# Altium PCB MergenSMPSBoardDesign.PcbDoc (part 3 of 3)
Units mm, origin at the board's own origin, x right, y up, seen from the top; angles counter-clockwise.
Board outline 115 x 90 mm, 4 copper layers (Top Layer, Layer 2, Layer 3, Bottom Layer), stack 1.527 mm thick; 83 components, 46 nets, 675 pads, 1118 vias.
Unrouted connection lines stored in the file: 1.
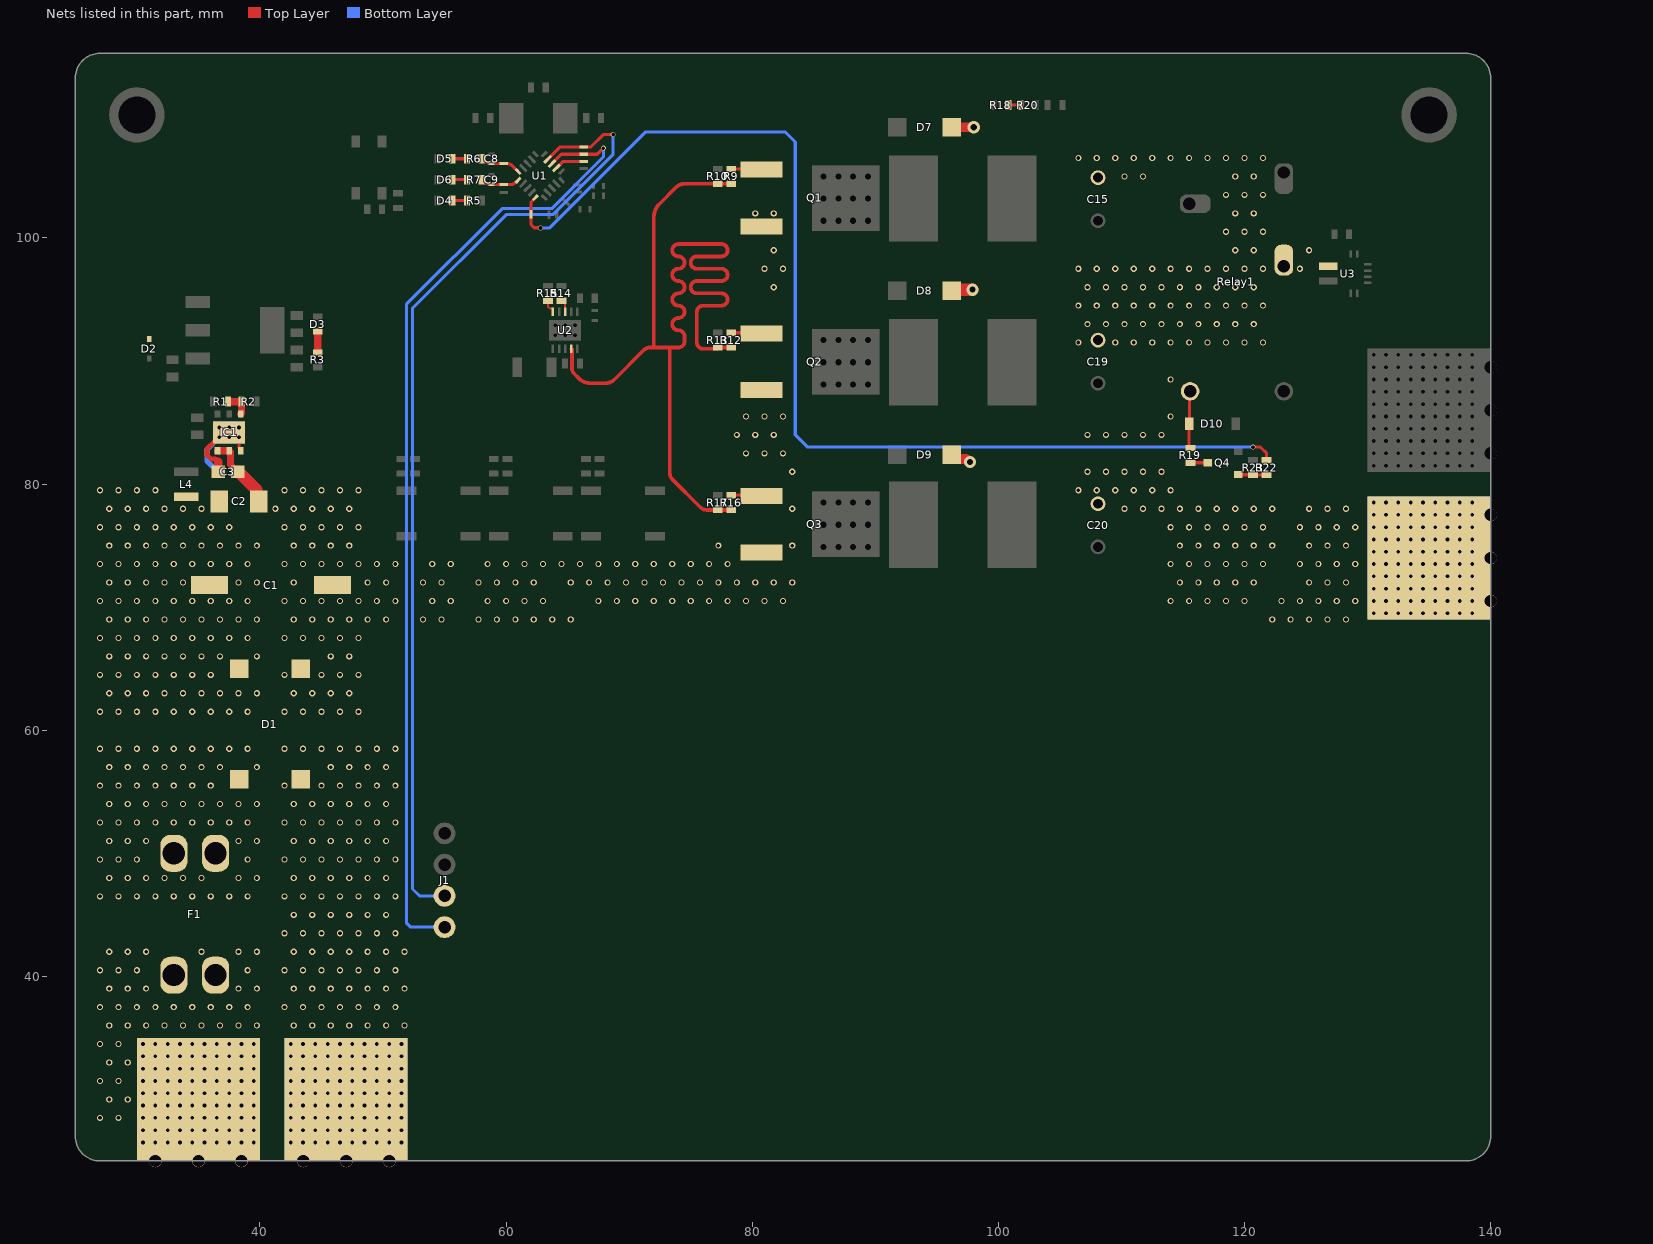
[diagram p5: the nets of this part, all layers, seen from the top]

## Via types
v1: diameter 0.5, hole 0.3, Top Layer to Bottom Layer, 829 vias
v2: diameter 0.5, hole 0.3, Top Layer to Bottom Layer, tented both sides, 255 vias
v3: diameter 0.406, hole 0.305, Top Layer to Bottom Layer, tented both sides, 25 vias
v4: diameter 3, hole 3, Top Layer to Bottom Layer, 4 vias
v5: diameter 1, hole 0.5, Top Layer to Bottom Layer, tented both sides, 3 vias
v6: diameter 0.406, hole 0.3, Top Layer to Bottom Layer, tented both sides, 2 vias

## Nets (pads, with @x,y where several pads share a name; then routed paths per layer and width w, separated by ;. In a path a pad name is that pad's centre, name@x,y a point inside that pad or via, vN(x,y) a via of type N, cw(c..) or ccw(c..) an arc to the next point about the centre after c; other vN are vias at no path point) (continued)
NetD1_3: D1.3 pad.10@47,30 pad.10@47.008,30.001 pad.12@42.5,26.5 pad.12@42.5,28.5 pad.12@42.5,30.5 pad.12@42.5,32.5 pad.12@42.5,34.5 pad.12@43.5,26.5 pad.12@43.5,28.5 pad.12@43.5,30.5 pad.12@43.5,32.5 pad.12@43.5,34.5 pad.12@44.5,26.5 pad.12@44.5,28.5 pad.12@44.5,30.5 pad.12@44.5,32.5 pad.12@44.5,34.5 pad.12@45.5,26.5 pad.12@45.5,28.5 pad.12@45.5,30.5 pad.12@45.5,32.5 pad.12@45.5,34.5 pad.12@46.5,26.5 pad.12@46.5,28.5 pad.12@46.5,30.5 pad.12@46.5,32.5 pad.12@46.5,34.5 pad.12@47.5,26.5 pad.12@47.5,28.5 pad.12@47.5,30.5 pad.12@47.5,32.5 pad.12@47.5,34.5 pad.12@48.5,26.5 pad.12@48.5,28.5 pad.12@48.5,30.5 pad.12@48.5,32.5 pad.12@48.5,34.5 pad.12@49.5,26.5 pad.12@49.5,28.5 pad.12@49.5,30.5 pad.12@49.5,32.5 pad.12@49.5,34.5 pad.12@50.5,26.5 pad.12@50.5,28.5 pad.12@50.5,30.5 pad.12@50.5,32.5 pad.12@50.5,34.5 pad.12@51.5,26.5 pad.12@51.5,28.5 pad.12@51.5,30.5 pad.12@51.5,32.5 pad.12@51.5,34.5 pad.13@42.5,27.5 pad.13@42.5,29.5 pad.13@42.5,31.5 pad.13@42.5,33.5 pad.13@43.5,27.5 pad.13@43.5,29.5 pad.13@43.5,31.5 pad.13@43.5,33.5 pad.13@44.5,27.5 pad.13@44.5,29.5 pad.13@44.5,31.5 pad.13@44.5,33.5 pad.13@45.5,27.5 pad.13@45.5,29.5 pad.13@45.5,31.5 pad.13@45.5,33.5 pad.13@46.5,27.5 pad.13@46.5,29.5 pad.13@46.5,31.5 pad.13@46.5,33.5 pad.13@47.5,27.5 pad.13@47.5,29.5 pad.13@47.5,31.5 pad.13@47.5,33.5 pad.13@48.5,27.5 pad.13@48.5,29.5 pad.13@48.5,31.5 pad.13@48.5,33.5 pad.13@49.5,27.5 pad.13@49.5,29.5 pad.13@49.5,31.5 pad.13@49.5,33.5 pad.13@50.5,27.5 pad.13@50.5,29.5 pad.13@50.5,31.5 pad.13@50.5,33.5 pad.13@51.5,27.5 pad.13@51.5,29.5 pad.13@51.5,31.5 pad.13@51.5,33.5 pad.14@43.508,25.001 pad.14@47.008,25.001 pad.14@50.508,25.001
  other v1: 42.75,36 44.25,36 45.75,36 47.25,36 48.75,36 50.25,36 51.75,36 42,37.5 43.5,37.5 45,37.5 46.5,37.5 48,37.5 49.5,37.5 51,37.5 42.75,39 44.25,39 45.75,39 47.25,39 48.75,39 50.25,39 51.75,39 42,40.5 43.5,40.5 45,40.5 46.5,40.5 48,40.5 49.5,40.5 51,40.5 42.75,42 44.25,42 45.75,42 47.25,42 48.75,42 50.25,42 51.75,42 42,43.5 43.5,43.5 45,43.5 46.5,43.5 48,43.5 49.5,43.5 51,43.5 42.75,45 44.25,45 45.75,45 47.25,45 48.75,45 50.25,45 42,46.5 43.5,46.5 45,46.5 46.5,46.5 48,46.5 49.5,46.5 51,46.5 42.75,48 44.25,48 45.75,48 47.25,48 48.75,48 50.25,48 42,49.5 43.5,49.5 45,49.5 46.5,49.5 48,49.5 49.5,49.5 51,49.5 42.75,51 44.25,51 45.75,51 47.25,51 48.75,51 50.25,51 42,52.5 43.5,52.5 45,52.5 46.5,52.5 48,52.5 49.5,52.5 51,52.5 42.75,54 44.25,54 45.75,54 47.25,54 48.75,54 50.25,54 42,55.5 45,55.5 46.5,55.5 48,55.5 49.5,55.5 51,55.5 45.75,57 47.25,57 48.75,57 50.25,57 42,58.5 43.5,58.5 45,58.5 46.5,58.5 48,58.5 49.5,58.5 51,58.5
NetD1_4: D1.4 F1.2
  other v1: 27,46.5 28.5,46.5 30,46.5 31.5,46.5 33,46.5 34.5,46.5 36,46.5 37.5,46.5 39,46.5 27.75,48 29.25,48 30.75,48 32.25,48 33.75,48 35.25,48 38.25,48 39.75,48 27,49.5 28.5,49.5 30,49.5 39,49.5 27.75,51 29.25,51 30.75,51 38.25,51 39.75,51 27,52.5 28.5,52.5 30,52.5 31.5,52.5 33,52.5 34.5,52.5 36,52.5 37.5,52.5 39,52.5 27.75,54 29.25,54 30.75,54 32.25,54 33.75,54 35.25,54 36.75,54 38.25,54 39.75,54 27,55.5 28.5,55.5 30,55.5 31.5,55.5 33,55.5 34.5,55.5 36,55.5 27.75,57 29.25,57 30.75,57 32.25,57 33.75,57 35.25,57 36.75,57 39.75,57 27,58.5 28.5,58.5 30,58.5 31.5,58.5 33,58.5 34.5,58.5 36,58.5 37.5,58.5 39,58.5
NetD3_1: D3.1 R3.2 | length 1.7
  Top Layer w0.6: R3.2@44.7,90.7 D3.1@44.7,92.4
NetD4_1: D4.1 R5.1 | length 1.2
  Top Layer w0.254: D4.1@55.618,103.036 R5.1@56.818,103.036
NetD5_2: D5.2 R6.1 | length 1.2
  Top Layer w0.254: D5.2@55.618,106.436 R6.1@56.818,106.436
NetD6_2: D6.2 R7.1 | length 1.2
  Top Layer w0.254: D6.2@55.618,104.736 R7.1@56.818,104.736
NetD10_1: D10.1 R19.2 Relay1.C1 | length 4.7
  Top Layer w0.254: Relay1.C1@115.58,87.541 115.54,87.501 115.54,84.94 D10.1@115.5,84.9 115.5,83.033 R19.2@115.6,82.933
NetF1_1: F1.1 pad.9@35,30 pad.12@30.5,26.5 pad.12@30.5,28.5 pad.12@30.5,30.5 pad.12@30.5,32.5 pad.12@30.5,34.5 pad.12@31.5,26.5 pad.12@31.5,28.5 pad.12@31.5,30.5 pad.12@31.5,32.5 pad.12@31.5,34.5 pad.12@32.5,26.5 pad.12@32.5,28.5 pad.12@32.5,30.5 pad.12@32.5,32.5 pad.12@32.5,34.5 pad.12@33.5,26.5 pad.12@33.5,28.5 pad.12@33.5,30.5 pad.12@33.5,32.5 pad.12@33.5,34.5 pad.12@34.5,26.5 pad.12@34.5,28.5 pad.12@34.5,30.5 pad.12@34.5,32.5 pad.12@34.5,34.5 pad.12@35.5,26.5 pad.12@35.5,28.5 pad.12@35.5,30.5 pad.12@35.5,32.5 pad.12@35.5,34.5 pad.12@36.5,26.5 pad.12@36.5,28.5 pad.12@36.5,30.5 pad.12@36.5,32.5 pad.12@36.5,34.5 pad.12@37.5,26.5 pad.12@37.5,28.5 pad.12@37.5,30.5 pad.12@37.5,32.5 pad.12@37.5,34.5 pad.12@38.5,26.5 pad.12@38.5,28.5 pad.12@38.5,30.5 pad.12@38.5,32.5 pad.12@38.5,34.5 pad.12@39.5,26.5 pad.12@39.5,28.5 pad.12@39.5,30.5 pad.12@39.5,32.5 pad.12@39.5,34.5 pad.13@30.5,27.5 pad.13@30.5,29.5 pad.13@30.5,31.5 pad.13@30.5,33.5 pad.13@31.5,27.5 pad.13@31.5,29.5 pad.13@31.5,31.5 pad.13@31.5,33.5 pad.13@32.5,27.5 pad.13@32.5,29.5 pad.13@32.5,31.5 pad.13@32.5,33.5 pad.13@33.5,27.5 pad.13@33.5,29.5 pad.13@33.5,31.5 pad.13@33.5,33.5 pad.13@34.5,27.5 pad.13@34.5,29.5 pad.13@34.5,31.5 pad.13@34.5,33.5 pad.13@35.5,27.5 pad.13@35.5,29.5 pad.13@35.5,31.5 pad.13@35.5,33.5 pad.13@36.5,27.5 pad.13@36.5,29.5 pad.13@36.5,31.5 pad.13@36.5,33.5 pad.13@37.5,27.5 pad.13@37.5,29.5 pad.13@37.5,31.5 pad.13@37.5,33.5 pad.13@38.5,27.5 pad.13@38.5,29.5 pad.13@38.5,31.5 pad.13@38.5,33.5 pad.13@39.5,27.5 pad.13@39.5,29.5 pad.13@39.5,31.5 pad.13@39.5,33.5 pad.14@31.5,25 pad.14@35,25 pad.14@38.5,25
  other v1: 27,28.5 28.5,28.5 27.75,30 29.25,30 27,31.5 28.5,31.5 27.75,33 29.25,33 27,34.5 28.5,34.5 27.75,36 29.25,36 30.75,36 32.25,36 33.75,36 35.25,36 36.75,36 38.25,36 39.75,36 27,37.5 28.5,37.5 30,37.5 31.5,37.5 33,37.5 34.5,37.5 36,37.5 37.5,37.5 39,37.5 27.75,39 29.25,39 30.75,39 38.25,39 39.75,39 27,40.5 28.5,40.5 30,40.5 39,40.5 27.75,42 29.25,42 30.75,42 35.25,42 38.25,42 39.75,42
NetJ1_1: J1.1 pad.@66.3,106.8 U1.18 | length 79.9
  Top Layer w0.254: U1.18@63.729,106.036 64.493,106.8 pad.@66.3,106.8 67.4,106.8 v3(67.9,107.3)
  Bottom Layer w0.254: J1.1@55,44 52.249,44 51.9,44.349 51.9,94.6 59.686,102.386 63.711,102.386 67.9,106.575 v3(67.9,107.3)
NetJ1_2: J1.2 pad.@66.3,107.4 U1.19 | length 79.3
  Top Layer w0.254: U1.19@63.376,106.39 64.386,107.4 pad.@66.3,107.4 66.9,107.4 67.9,108.4 v3(68.7,108.4)
  Bottom Layer w0.254: J1.2@55,46.54 52.96,46.54 52.4,47.1 52.4,94.3 60,101.9 63.8,101.9 68.7,106.8 v3(68.7,108.4)
NetQ1_1: Q1.1 R9.2 | length 2.4
  Top Layer w0.254: R9.2@78.4,105.6 80.7,105.6 Q1.1@80.75,105.55
NetQ2_1: Q2.1 R12.2 | length 2.5
  Top Layer w0.254: R12.2@78.3,92.3 80.7,92.3 Q2.1@80.75,92.25
NetQ3_1: Q3.1 R16.2 | length 2.5
  Top Layer w0.254: R16.2@78.3,79.1 80.7,79.1 Q3.1@80.75,79.05
NetQ4_1: Q4.1 R22.2 R23.2 | length 2.3
  Top Layer w0.254: Q4.1@119.5,80.783 119.525,80.758 120.675,80.758 R23.2@120.7,80.733 R22.2@121.8,80.733
NetQ4_3: Q4.3 R19.1 | length 1.4
  Top Layer w0.254: R19.1@115.6,81.733 Q4.3@117,81.733
NetR1_1: IC1.4 R1.1 R2.2 | length 2.1
  Top Layer w0.6: R1.1@37.4,86.7 R2.2@38.5,86.7 38.5,85.75 IC1.4@38.45,85.7
NetR9_1: R9.1 R10.2 R12.1 R13.2 R16.1 R17.2 U2.4 | length 87.3
  Top Layer w0.305: U2.4@65.3,91 65.352,90.948 65.352,90.329 65.355,90.326 65.355,89.4 ccw(c65.97,89.4) 65.535,88.965 65.917,88.583 ccw(c66.841,89.506) 66.841,88.2 68.095,88.2 ccw(c68.095,89.179) 68.787,88.487 71.188,90.888 ; 71.188,90.888 cw(c71.7,90.376) 71.7,91.1 72,91.1 ; 75.775,78.125 73.523,80.377 cw(c74.063,80.916) 73.3,80.916 73.3,91.1 ; 75.776,78.124 ccw(c76.318,78.668) 76.318,77.9 R17.2@77.2,77.9 R16.1@78.3,77.9 R16.1@78.4,77.9 ; R12.1@78.4,91.1 R12.1@78.3,91.1 R13.2@77.2,91.1 cw(c77.1,91.1) 77.1,91 76,91 cw(c76,91.5) 75.5,91.5 75.5,93.992 cw(c76.008,93.992) 76.008,94.5 77.5,94.5 ccw(c77.5,95) 78,95 ccw(c77.5,95) 77.5,95.5 75.5,95.5 cw(c75.5,96) 75,96 cw(c75.5,96) 75.5,96.5 77.5,96.5 ccw(c77.5,97) 78,97 ccw(c77.5,97) 77.5,97.5 75.5,97.5 cw(c75.5,98) 75,98 cw(c75.5,98) 75.5,98.5 77.5,98.5 ccw(c77.5,99) 77.5,99.5 74,99.5 ccw(c74,99) 74,98.5 cw(c73.999,98) 74,97.5 ccw(c74,97) 73.5,97 ccw(c74,97) 74,96.5 cw(c74,96) 74.5,96 cw(c74,96) 74,95.5 ccw(c74,95) 73.5,95 ccw(c74,95) 74,94.5 cw(c74,94) 74.5,94 cw(c74,94) 74,93.5 ccw(c74,93) 73.5,93 ccw(c74,93) 74,92.5 cw(c74,92) 74.5,92 74.5,91.6 cw(c74,91.6) 74,91.1 73.3,91.1 ; R9.1@78.4,104.4 R9.1@78.3,104.4 R10.2@77.2,104.4 74.485,104.4 ccw(c74.485,103.477) 73.832,104.13 72.438,102.736 ccw(c73.497,101.677) 72,101.677 72,91.1 ; 72,91.1 73.3,91.1
NetR14_1: R14.1 U2.8 | length 1.1
  Top Layer w0.152: R14.1@64.5,94.9 64.626,94.9 64.8,94.726 U2.8@64.8,94
NetR15_1: R15.1 U2.10 | length 1.2
  Top Layer w0.152: R15.1@63.4,94.9 63.4,94.421 63.548,94.274 63.776,94.274 63.8,94.25 U2.10@63.8,94
NetR18_2: R18.2 R20.1 | length 1
  Top Layer w0.254: R18.2@100.8,110.8 R20.1@101.8,110.8
NetR22_1: pad.@62.018,101.936 R22.1 U1.10 | length 90.8
  Top Layer w0.254: U1.10@62.386,103.279 62.386,103.276 62.018,102.908 pad.@62.018,101.936 62.018,101.082 62.271,100.829 62.771,100.829 v3(62.8,100.8) ; v3(120.7,83) 121.3,83 121.8,82.5 R22.1@121.8,81.933
  Bottom Layer w0.254: v3(62.8,100.8) 63.5,100.8 71.3,108.6 82.7,108.6 83.5,107.8 83.5,84 84.5,83 v3(120.7,83)
NetU1_17: pad.@66.3,106.2 U1.17 | length 2.4
  Top Layer w0.254: U1.17@64.083,105.683 64.086,105.683 64.603,106.2 pad.@66.3,106.2
PGND: C1.1 C2.2 C3.2 C15.KATOT C19.KATOT C20.KATOT D1.2 D7.1 D8.1 D9.1 IC1.3 L4.1 pad.9@135,74 pad.12@130.5,69.5 pad.12@130.5,70.5 pad.12@130.5,71.5 pad.12@130.5,72.5 pad.12@130.5,73.5 pad.12@130.5,74.5 pad.12@130.5,75.5 pad.12@130.5,76.5 pad.12@130.5,77.5 pad.12@130.5,78.5 pad.12@132.5,69.5 pad.12@132.5,70.5 pad.12@132.5,71.5 pad.12@132.5,72.5 pad.12@132.5,73.5 pad.12@132.5,74.5 pad.12@132.5,75.5 pad.12@132.5,76.5 pad.12@132.5,77.5 pad.12@132.5,78.5 pad.12@134.5,69.5 pad.12@134.5,70.5 pad.12@134.5,71.5 pad.12@134.5,72.5 pad.12@134.5,73.5 pad.12@134.5,74.5 pad.12@134.5,75.5 pad.12@134.5,76.5 pad.12@134.5,77.5 pad.12@134.5,78.5 pad.12@136.5,69.5 pad.12@136.5,70.5 pad.12@136.5,71.5 pad.12@136.5,72.5 pad.12@136.5,73.5 pad.12@136.5,74.5 pad.12@136.5,75.5 pad.12@136.5,76.5 pad.12@136.5,77.5 pad.12@136.5,78.5 pad.12@138.5,69.5 pad.12@138.5,70.5 pad.12@138.5,71.5 pad.12@138.5,72.5 pad.12@138.5,73.5 pad.12@138.5,74.5 pad.12@138.5,75.5 pad.12@138.5,76.5 pad.12@138.5,77.5 pad.12@138.5,78.5 pad.13@131.5,69.5 pad.13@131.5,70.5 pad.13@131.5,71.5 pad.13@131.5,72.5 pad.13@131.5,73.5 pad.13@131.5,74.5 pad.13@131.5,75.5 pad.13@131.5,76.5 pad.13@131.5,77.5 pad.13@131.5,78.5 pad.13@133.5,69.5 pad.13@133.5,70.5 pad.13@133.5,71.5 pad.13@133.5,72.5 pad.13@133.5,73.5 pad.13@133.5,74.5 pad.13@133.5,75.5 pad.13@133.5,76.5 pad.13@133.5,77.5 pad.13@133.5,78.5 pad.13@135.5,69.5 pad.13@135.5,70.5 pad.13@135.5,71.5 pad.13@135.5,72.5 pad.13@135.5,73.5 pad.13@135.5,74.5 pad.13@135.5,75.5 pad.13@135.5,76.5 pad.13@135.5,77.5 pad.13@135.5,78.5 pad.13@137.5,69.5 pad.13@137.5,70.5 pad.13@137.5,71.5 pad.13@137.5,72.5 pad.13@137.5,73.5 pad.13@137.5,74.5 pad.13@137.5,75.5 pad.13@137.5,76.5 pad.13@137.5,77.5 pad.13@137.5,78.5 pad.14@140,70.5 pad.14@140,74 pad.14@140,77.5 | length 13.9
  Top Layer w0.254: IC1.3@38.3,83.8 38.3,82.925 38.45,82.775 IC1.3@38.45,82.7
  Top Layer w0.4: 36.6,81.813 36.366,82.048 36.002,82.048 35.7,82.35 35.7,82.873 36.313,83.487 36.387,83.487 IC1.3@36.7,83.8
  Top Layer w0.7: C3.2@36.6,81 36.6,81.813
  Top Layer w0.8: D9.1@96.2,82.4 96.55,82.05 97.396,82.05 97.646,81.8 v5(97.7,81.8) ; D7.1@96.2,109 v5(98,109)
  Top Layer w1: D8.1@96.2,95.7 96.3,95.8 v5(97.9,95.8)
  Bottom Layer w0.4: 36.575,81 35.7,81.875 35.7,82.8 IC1.3@36.7,83.8
  other v1: 27,61.5 28.5,61.5 30,61.5 31.5,61.5 33,61.5 34.5,61.5 36,61.5 37.5,61.5 39,61.5 27.75,63 29.25,63 30.75,63 32.25,63 33.75,63 35.25,63 36.75,63 38.25,63 39.75,63 27,64.5 28.5,64.5 30,64.5 31.5,64.5 33,64.5 34.5,64.5 36,64.5 27.75,66 29.25,66 30.75,66 32.25,66 33.75,66 35.25,66 36.75,66 39.75,66 27,67.5 28.5,67.5 30,67.5 31.5,67.5 33,67.5 34.5,67.5 36,67.5 37.5,67.5 39,67.5 27.75,69 29.25,69 30.75,69 32.25,69 33.75,69 35.25,69 36.75,69 38.25,69 39.75,69 122.25,69 123.75,69 125.25,69 126.75,69 128.25,69 27,70.5 28.5,70.5 30,70.5 31.5,70.5 33,70.5 34.5,70.5 36,70.5 37.5,70.5 39,70.5 114,70.5 115.5,70.5 117,70.5 118.5,70.5 120,70.5 123,70.5 124.5,70.5 126,70.5 127.5,70.5 129,70.5 27.75,72 29.25,72 30.75,72 32.25,72 33.75,72 38.25,72 39.75,72 114.75,72 116.25,72 117.75,72 119.25,72 120.75,72 125.25,72 126.75,72 128.25,72 27,73.5 28.5,73.5 30,73.5 31.5,73.5 33,73.5 34.5,73.5 36,73.5 37.5,73.5 39,73.5 114,73.5 115.5,73.5 117,73.5 118.5,73.5 120,73.5 121.5,73.5 124.5,73.5 126,73.5 127.5,73.5 129,73.5 27.75,75 29.25,75 30.75,75 32.25,75 33.75,75 35.25,75 36.75,75 38.25,75 39.75,75 114.75,75 116.25,75 117.75,75 119.25,75 120.75,75 122.25,75 125.25,75 126.75,75 128.25,75 27,76.5 28.5,76.5 30,76.5 31.5,76.5 33,76.5 34.5,76.5 36,76.5 37.5,76.5 114,76.5 115.5,76.5 117,76.5 118.5,76.5 120,76.5 121.5,76.5 124.5,76.5 126,76.5 127.5,76.5 129,76.5 27.75,78 29.25,78 30.75,78 32.25,78 33.75,78 35.25,78 110.25,78 111.75,78 113.25,78 114.75,78 116.25,78 117.75,78 119.25,78 120.75,78 122.25,78 125.25,78 126.75,78 128.25,78 27,79.5 28.5,79.5 30,79.5 31.5,79.5 106.5,79.5 108,79.5 109.5,79.5 111,79.5 112.5,79.5 114,79.5 107.25,81 108.75,81 110.25,81 111.75,81 113.25,81 107.25,84 108.75,84 110.25,84 111.75,84 113.25,84 114,85.5 114,88.5 106.5,91.5 109.5,91.5 111,91.5 112.5,91.5 114,91.5 115.5,91.5 117,91.5 118.5,91.5 120,91.5 121.5,91.5 107.25,93 108.75,93 110.25,93 111.75,93 113.25,93 114.75,93 116.25,93 117.75,93 119.25,93 120.75,93 106.5,94.5 108,94.5 109.5,94.5 111,94.5 112.5,94.5 114,94.5 115.5,94.5 117,94.5 118.5,94.5 120,94.5 121.5,94.5 107.25,96 108.75,96 110.25,96 111.75,96 113.25,96 114.75,96 116.25,96 117.75,96 119.25,96 120.75,96 106.5,97.5 108,97.5 109.5,97.5 111,97.5 112.5,97.5 114,97.5 115.5,97.5 117,97.5 118.5,97.5 120,97.5 121.5,97.5 119.25,99 120.75,99 118.5,100.5 120,100.5 121.5,100.5 119.25,102 120.75,102 118.5,103.5 120,103.5 121.5,103.5 110.25,105 111.75,105 119.25,105 120.75,105 106.5,106.5 108,106.5 109.5,106.5 111,106.5 112.5,106.5 114,106.5 115.5,106.5 117,106.5 118.5,106.5 120,106.5 121.5,106.5
Relay_OUT: Relay1.NC U3.1
  other v1: 124.5,97.5 125.25,99
STM32_RX: C9.1 pad.@59.818,104.336 R7.2 U1.6 | length 3.2
  Top Layer w0.254: R7.2@58.018,104.736 58.135,104.619 ccw(c58.818,105.302) C9.1@58.818,104.336 pad.@59.818,104.336 60.33,104.336 ccw(c60.33,105.024) 60.817,104.538 U1.6@60.972,104.693 U1.6@60.969,104.693
STM32_TX: C8.1 pad.@59.818,106.036 R6.2 U1.5 | length 3.3
  Top Layer w0.254: R6.2@58.018,106.436 58.135,106.319 ccw(c58.818,107.002) C8.1@58.818,106.036 pad.@59.818,106.036 60.118,106.036 cw(c60.118,105.512) 60.489,105.883 U1.5@60.972,105.4
USB5V: D2.1
VCC: C1.2 C2.1 C3.1 D1.1 IC1.1 IC1.2 Q1.3 Q2.3 Q3.3 | length 6.1
  Top Layer w0.6: IC1.1@36.55,82.7 IC1.2@37.5,82.7 37.602,82.598 37.602,81.548 38.15,81 C3.1@38.2,81
  Top Layer w1: C3.1@38.2,81 38.25,81 39.7,79.55 39.7,78.8 C2.1@39.9,78.6
  other v1: 42,61.5 43.5,61.5 45,61.5 46.5,61.5 48,61.5 42.75,63 44.25,63 45.75,63 47.25,63 42,64.5 45,64.5 46.5,64.5 48,64.5 45.75,66 47.25,66 42,67.5 43.5,67.5 45,67.5 46.5,67.5 48,67.5 42.75,69 44.25,69 45.75,69 47.25,69 48.75,69 50.25,69 53.25,69 54.75,69 57.75,69 59.25,69 60.75,69 62.25,69 63.75,69 65.25,69 42,70.5 43.5,70.5 45,70.5 46.5,70.5 48,70.5 49.5,70.5 51,70.5 54,70.5 55.5,70.5 58.5,70.5 60,70.5 61.5,70.5 63,70.5 67.5,70.5 69,70.5 70.5,70.5 72,70.5 73.5,70.5 75,70.5 76.5,70.5 78,70.5 79.5,70.5 81,70.5 82.5,70.5 42.75,72 48.75,72 50.25,72 53.25,72 54.75,72 57.75,72 59.25,72 60.75,72 62.25,72 65.25,72 66.75,72 68.25,72 69.75,72 71.25,72 72.75,72 74.25,72 75.75,72 77.25,72 78.75,72 80.25,72 81.75,72 83.25,72 42,73.5 43.5,73.5 45,73.5 46.5,73.5 48,73.5 49.5,73.5 51,73.5 54,73.5 55.5,73.5 58.5,73.5 60,73.5 61.5,73.5 63,73.5 64.5,73.5 66,73.5 67.5,73.5 69,73.5 70.5,73.5 72,73.5 73.5,73.5 75,73.5 76.5,73.5 78,73.5 42.75,75 44.25,75 45.75,75 47.25,75 77.25,75 83.25,75 42,76.5 43.5,76.5 45,76.5 46.5,76.5 48,76.5 41.25,78 42.75,78 44.25,78 45.75,78 47.25,78 83.25,78 42,79.5 43.5,79.5 45,79.5 46.5,79.5 48,79.5 83.25,81 79.5,82.5 81,82.5 82.5,82.5 78.75,84 80.25,84 81.75,84 79.5,85.5 81,85.5 82.5,85.5 81.75,96 81,97.5 82.5,97.5 81.75,99 80.25,102 81.75,102
pads on no net: IC1.5 Relay1.NO U1.8 U1.9 U2.2 U3.4 U3.5
copper on no net:
  other v4: 60,32.5 135,32.5 60,63.5 135,63.5

## Polygon pours and split planes (outlines as drawn)
HS on Bottom Layer "HS_L04_P027" (solid, pour order 27): 95,72 85,72 85,111 95,111 95,107.5 95,98.5 95,94 95,85 95,81
NetD1_3 on Bottom Layer "NETD1_3_L04_P021" (solid, pour order 21): 41.5,27 41.5,59.5 52.5,59.5 52.5,27
Current_OUT on Bottom Layer "CURRENT_OUT_L04_P032" (solid, pour order 32): 126.7,97 125.5,97 125.5,80 137.5,80 137.5,93.5 126.7,93.5
Relay_OUT on Bottom Layer "RELAY_OUT_L04_P031" (solid, pour order 31): 126.7,97 125,97 125,96 122,96 122,100 126.7,100
PGND on Bottom Layer "PGND_L04_P030" (solid, pour order 30): 106,80.5 106,77 113,77 113,67.5 137.5,67.5 137.5,79.5 137,79 114.5,79 114.5,80.5
PGND on Bottom Layer "PGND_L04_P029" (solid, pour order 29): 106,77 106,85 113,85 113,90 106,90 106,98.5 118,98.5 118,105 112,105 112,103.5 106,103.5 106,108.5 122,108.5 122,90 114.5,90 114.5,77
NetC15_ANOT on Bottom Layer "NETC15_ANOT_L04_P012" (solid, pour order 12): 112.5,76.5 112.5,72 99,72 99,108.5 105.5,108.5 105.5,103 112.5,103 112.5,104.5 117.5,104.5 117.5,103 117.5,99 105.5,99 105.5,89.5 112.5,89.5 112.5,85.5 105.5,85.5 105.5,76.5
VCC on Bottom Layer "VCC_L04_P026" (solid, pour order 26): 41.5,67.5 84.5,67.5 84.5,103 78.5,103 78.5,102.5 78.5,99.5 80,99.5 80,94.5 82.7,94.5 82.7,89.5 78,89.5 78,81.5 82.7,81.5 82.7,76 76.5,76 76.5,74 41.5,74
VCC on Bottom Layer "VCC_L04_P025" (solid, pour order 25): 41.5,60.5 41.5,76.5 38.5,76.5 38.5,80 48.5,80 48.5,60.5
DGND on Bottom Layer "DGND_L04_P018" (solid, pour order 18): 35.3,80 26,80 26,96.8 44.5,96.8 44.5,95.8 46,94.3 46,92.9 42.2,92.9 42.2,94.8 39,94.8 39,93.3 29.9,93.3 29.9,89.3 31.8,89.3 34.2,89.3 34.2,86.6 34.2,84.5 35.3,84.5
PGND on Bottom Layer "PGND_L04_P022" (solid, pour order 22): 35.5,80 35.5,82 37.5,82 37.5,80 38,80 38,76 40.5,76 40.5,68 40.5,60 40,60 26,60 26,80
NetD1_4 on Bottom Layer "NETD1_4_L04_P019" (solid, pour order 19): 26,45 26,59.5 40,59.5 40,45
NetF1_1 on Bottom Layer "NETF1_1_L04_P003" (solid, pour order 3): 40.5,26.9 40.5,43.9 26,43.9 26,26.9
PGND on Top Layer "PGND_L01_P008" (solid, pour order 8): 35.5,80 35.5,82 37.5,82 37.5,80 38,80 38,76 40.5,76 40.5,68 40.5,60 40,60 26,60 26,80
VCC on Top Layer "VCC_L01_P009" (solid, pour order 9): 41.5,60.5 41.5,76.5 38.5,76.5 38.5,80 48.5,80 48.5,60.5
NetC15_ANOT on Top Layer "NETC15_ANOT_L01_P028" (solid, pour order 28): 112.5,76.5 112.5,72 99,72 99,108.5 105.5,108.5 105.5,103 112.5,103 112.5,104.5 117.5,104.5 117.5,103 117.5,99 105.5,99 105.5,89.5 112.5,89.5 112.5,85.5 105.5,85.5 105.5,76.5
Current_OUT on Top Layer "CURRENT_OUT_L01_P016" (solid, pour order 16): 126.7,97 125.5,97 125.5,80 137.5,80 137.5,93.5 126.7,93.5
PGND on Top Layer "PGND_L01_P014" (solid, pour order 14): 106,77 106,85 113,85 113,90 106,90 106,98.5 118,98.5 118,105 112,105 112,103.5 106,103.5 106,108.5 122,108.5 122,90 114.5,90 114.5,77
DGND on Top Layer "DGND_L01_P024" (solid, pour order 24): 35.3,80 26,80 26,96.8 44.5,96.8 44.5,95.8 46,94.3 46,92.9 42.2,92.9 42.2,94.8 39,94.8 39,93.3 29.9,93.3 29.9,89.3 31.8,89.3 34.2,89.3 34.2,86.6 34.2,84.5 35.3,84.5
NetF1_1 on Top Layer "NETF1_1_L01_P020" (solid, pour order 20): 40.549,26.88 40.549,43.88 26.049,43.88 26.049,26.88
VCC on Top Layer "VCC_L01_P010" (solid, pour order 10): 41.5,67.5 84.5,67.5 84.5,103 78.5,103 78.5,102.5 78.5,99.5 80,99.5 80,94.5 82.7,94.5 82.7,89.5 78,89.5 78,81.5 82.7,81.5 82.7,76 76.5,76 76.5,74 41.5,74
NetD1_3 on Top Layer "NETD1_3_L01_P005" (solid, pour order 5): 41.5,27 41.5,59.5 52.5,59.5 52.5,27
NetD1_4 on Top Layer "NETD1_4_L01_P004" (solid, pour order 4): 26,45 26,59.5 40,59.5 40,45
Relay_OUT on Top Layer "RELAY_OUT_L01_P015" (solid, pour order 15): 126.7,97 125,97 125,96 122,96 122,100 126.7,100
PGND on Top Layer "PGND_L01_P017" (solid, pour order 17): 106,80.5 106,77 113,77 113,67.5 137.5,67.5 137.5,79 137,79 114.5,79 114.5,80.5
HS on Top Layer "HS_L01_P011" (solid, pour order 11): 95,72 85,72 85,111 95,111 95,107.5 95,98.5 95,94 95,85 95,81
PGND on Layer 3 (split plane): 27,114.49 138,114.49 138.015,114.491 138.167,114.482 138.332,114.454 138.493,114.408 138.647,114.344 138.794,114.263 138.93,114.166 139.055,114.055 139.166,113.93 139.263,113.794 139.344,113.647 139.408,113.493 139.454,113.332 139.482,113.167 139.491,113.015 139.49,113 139.49,27 139.491,26.985 139.482,26.833 139.454,26.668 139.408,26.507 139.344,26.353 139.263,26.206 139.166,26.07 139.055,25.945 138.93,25.834 138.794,25.737 138.647,25.656 138.493,25.592 138.332,25.546 138.167,25.518 138.015,25.509 138,25.51 27,25.51 26.985,25.509 26.833,25.518 26.668,25.546 26.507,25.592 26.353,25.656 26.206,25.737 26.07,25.834 25.945,25.945 25.834,26.07 25.737,26.206 25.656,26.353 25.592,26.507 25.546,26.668 25.518,26.833 25.509,26.985 25.51,27 25.51,113 25.509,113.015 25.518,113.167 25.546,113.332 25.592,113.493 25.656,113.647 25.737,113.794 25.834,113.93 25.945,114.055 26.07,114.166 26.206,114.263 26.353,114.344 26.507,114.408 26.668,114.454 26.833,114.482 26.985,114.491
DGND on Layer 2 (split plane): 27,114.49 138,114.49 138.015,114.491 138.167,114.482 138.332,114.454 138.493,114.408 138.647,114.344 138.794,114.263 138.93,114.166 139.055,114.055 139.166,113.93 139.263,113.794 139.344,113.647 139.408,113.493 139.454,113.332 139.482,113.167 139.491,113.015 139.49,113 139.49,27 139.491,26.985 139.482,26.833 139.454,26.668 139.408,26.507 139.344,26.353 139.263,26.206 139.166,26.07 139.055,25.945 138.93,25.834 138.794,25.737 138.647,25.656 138.493,25.592 138.332,25.546 138.167,25.518 138.015,25.509 138,25.51 27,25.51 26.985,25.509 26.833,25.518 26.668,25.546 26.507,25.592 26.353,25.656 26.206,25.737 26.07,25.834 25.945,25.945 25.834,26.07 25.737,26.206 25.656,26.353 25.592,26.507 25.546,26.668 25.518,26.833 25.509,26.985 25.51,27 25.51,113 25.509,113.015 25.518,113.167 25.546,113.332 25.592,113.493 25.656,113.647 25.737,113.794 25.834,113.93 25.945,114.055 26.07,114.166 26.206,114.263 26.353,114.344 26.507,114.408 26.668,114.454 26.833,114.482 26.985,114.491

## Other copper
Top Layer:
  region net DGND: 55.585,107.883 55.702,107.883 ccw(c55.702,108.566) 56.185,108.083 ccw(c55.702,107.6) 55.702,108.283 55.585,108.283
  region net 3.3V: 128.292,108.907 128.292,108.79 ccw(c128.974,108.79) 128.492,108.307 ccw(c128.009,108.79) 128.692,108.79 128.692,108.907
  region net DGND: 64.4,97.5 64.4,97.383 ccw(c65.083,97.383) 64.6,96.9 ccw(c64.117,97.383) 64.8,97.383 64.8,97.5
  region net NetC22_2: 57.586,85.186 57.586,85.069 ccw(c58.269,85.069) 57.787,84.586 ccw(c57.304,85.069) 57.987,85.069 57.987,85.186
  region net NetC23_2: 61.262,85.162 61.262,85.045 ccw(c61.945,85.045) 61.462,84.562 ccw(c60.98,85.045) 61.662,85.045 61.662,85.162
  region net NetJ1_2: 68.704,108.593 68.586,108.593 ccw(c68.586,107.91) 68.104,108.393 ccw(c68.586,108.876) 68.586,108.193 68.704,108.193
  region net NetJ1_1: 68.04,107.182 67.937,107.079 cw(c67.489,107.527) 67.489,106.894 cw(c68.102,106.894) 67.669,107.327 67.76,107.418
  region net NetR22_1: 62.8,101 62.683,101 ccw(c62.683,100.317) 62.2,100.8 ccw(c62.683,101.283) 62.683,100.6 62.8,100.6
  region net NetC22_2: 62.549,99.812 62.652,99.914 cw(c63.1,99.467) 63.1,100.1 cw(c62.487,100.1) 62.92,99.667 62.829,99.576
  region net NetC24_2: 69.182,105.06 69.079,105.163 cw(c69.527,105.611) 68.894,105.611 cw(c68.894,104.998) 69.327,105.431 69.418,105.34
  region net 7.5V: 64.008,86.893 64.008,87.01 ccw(c63.326,87.01) 63.808,87.493 ccw(c64.291,87.01) 63.608,87.01 63.608,86.893
  region net NetC18_1: 60.789,97.138 60.686,97.241 cw(c61.134,97.688) 60.5,97.688 cw(c60.5,97.076) 60.934,97.509 61.025,97.418
  region net NetR22_1: 120.693,82.792 120.81,82.792 ccw(c120.81,83.474) 121.293,82.992 ccw(c120.81,82.509) 120.81,83.192 120.693,83.192
  region net 3.3V: 128.292,108.907 128.292,108.79 ccw(c128.974,108.79) 128.492,108.307 ccw(c128.009,108.79) 128.692,108.79 128.692,108.907
  region net 3.3V: 128.084,113.216 ccw(c128.724,113.216) 128.271,112.764 128.364,112.671 128.625,112.932 128.631,112.932 128.533,113.03 ccw(c128.084,112.581)
  region net NetC24_2: 62.3,85.1 62.3,84.983 ccw(c62.983,84.983) 62.5,84.5 ccw(c62.017,84.983) 62.7,84.983 62.7,85.1
  region net NetC23_2: 62.5,98.2 62.617,98.2 ccw(c62.617,98.883) 63.1,98.4 ccw(c62.617,97.917) 62.617,98.6 62.5,98.6
  region net NetC18_1: 68.1,95.3 68.5,95.3 68.6,95.2 68.6,94.7 68.3,94.7 68.1,94.9 68.105,94.905 68.105,95.095
  region net NetC10_1: 104.1,110.8 103.5,111.4 102.9,110.8
  region net 3.3V: 45.2,98.695 45.8,99.295 45.2,99.895
  region net NetC11_1: 65.3,102.479 65.443,102.336 65.3,101.718
  region net 7.5V: 62.7,87.8 64,88.745 64,86.973
  region net 3.3V: 53.617,108.9 53.017,109.5 52.417,108.9
  region net 3.3V: 52,85.863 52.6,85.263 53.2,85.863
  region net 3.3V: 51.8,99.3 51.2,99.9 50.6,99.3
  region net 3.3V: 53.3,99.301 52.7,99.901 52.1,99.301
  region net 3.3V: 55,88.3 55,89.4 57.2,89.4 57.2,88.3
  region net 3.3V: 55,85.9 55,87 57.2,87 57.2,85.9
  region net 3.3V: 59.5,85.9 60.1,85.3 60.7,85.9
  region net NetR9_1: 72.625,91.1 71.975,91.828 71.375,91.1
  region net NetR9_1: 72.65,91.1 73.3,90.372 73.9,91.1
  region net Current_OUT: 139.25,81.75 140,81.75 140,83.25 139.25,83.25
  region net Current_OUT: 139.25,85.25 140,85.25 140,86.75 139.25,86.75
  region net Current_OUT: 139.25,88.75 140,88.75 140,90.25 139.25,90.25
  region net PGND: 139.25,69.75 140,69.75 140,71.25 139.25,71.25
  region net PGND: 139.25,73.25 140,73.25 140,74.75 139.25,74.75
  region net PGND: 139.25,76.75 140,76.75 140,78.25 139.25,78.25
  region net NetD1_3: 42.758,25.751 42.758,25.001 44.258,25.001 44.258,25.751
  region net NetD1_3: 46.258,25.751 46.258,25.001 47.758,25.001 47.758,25.751
  region net NetD1_3: 49.758,25.751 49.758,25.001 51.258,25.001 51.258,25.751
  region net NetF1_1: 37.75,25.75 37.75,25 39.25,25 39.25,25.75
  region net NetF1_1: 34.25,25.75 34.25,25 35.75,25 35.75,25.75
  region net NetF1_1: 30.75,25.75 30.75,25 32.25,25 32.25,25.75
Bottom Layer:
  region net 3.3V: 128.708,108.893 128.708,109.01 ccw(c128.026,109.01) 128.508,109.493 ccw(c128.991,109.01) 128.308,109.01 128.308,108.893
  region net NetC18_1: 68.1,95.3 67.983,95.3 ccw(c67.983,94.617) 67.5,95.1 ccw(c67.983,95.583) 67.983,94.9 68.1,94.9
  region net HS: 68.6,91.1 68.717,91.1 ccw(c68.717,91.783) 69.2,91.3 ccw(c68.717,90.817) 68.717,91.5 68.6,91.5
  region net NetC22_2: 57.995,85.179 57.995,85.296 ccw(c57.312,85.296) 57.795,85.779 ccw(c58.278,85.296) 57.595,85.296 57.595,85.179
  region net NetJ1_1: 67.7,107.3 67.7,107.183 ccw(c68.383,107.183) 67.9,106.7 ccw(c67.417,107.183) 68.1,107.183 68.1,107.3
  region net NetR22_1: 62.8,100.6 62.917,100.6 ccw(c62.917,101.283) 63.4,100.8 ccw(c62.917,100.317) 62.917,101 62.8,101
  region net NetC22_2: 62.7,99.9 62.583,99.9 ccw(c62.583,99.217) 62.1,99.7 ccw(c62.583,100.183) 62.583,99.5 62.7,99.5
  region net NetJ1_2: 68.5,108.4 68.5,108.283 ccw(c69.183,108.283) 68.7,107.8 ccw(c68.217,108.283) 68.9,108.283 68.9,108.4
  region net 7.5V: 63.59,86.909 63.59,86.792 ccw(c64.273,86.792) 63.79,86.309 ccw(c63.307,86.792) 63.99,86.792 63.99,86.909
  region net NetR22_1: 120.707,83.208 120.59,83.208 ccw(c120.59,82.526) 120.107,83.008 ccw(c120.59,83.491) 120.59,82.808 120.707,82.808
  region net 3.3V: 128.708,108.893 128.708,109.01 ccw(c128.026,109.01) 128.508,109.493 ccw(c128.991,109.01) 128.308,109.01 128.308,108.893
  region net NetC24_2: 62.708,85.093 62.708,85.21 ccw(c62.026,85.21) 62.508,85.693 ccw(c62.991,85.21) 62.308,85.21 62.308,85.093
  region net NetC23_2: 61.671,85.155 61.671,85.272 ccw(c60.988,85.272) 61.471,85.755 ccw(c61.954,85.272) 61.271,85.272 61.271,85.155
  region net NetC18_1: 61.018,97.429 61.121,97.326 cw(c60.673,96.878) 61.306,96.878 cw(c61.306,97.491) 60.873,97.058 60.782,97.149
  region net NetC24_2: 69.1,105.2 69.1,105.083 ccw(c69.783,105.083) 69.3,104.6 ccw(c68.817,105.083) 69.5,105.083 69.5,105.2
  region net NetC23_2: 62.507,98.608 62.39,98.608 ccw(c62.39,97.926) 61.907,98.408 ccw(c62.39,98.891) 62.39,98.208 62.507,98.208
  region net 3.3V: 128.5,112.1 ccw(c128.061,112.539) 128.682,112.539 128.682,112.813 128.324,112.813 128.315,112.804 128.315,112.571 ccw(c128.947,112.571) 128.5,112.124
  region net 3.3V: 55,85.9 55,89.4 57.2,89.4 57.2,85.9
  region net Current_OUT: 139.25,81.75 140,81.75 140,83.25 139.25,83.25
  region net Current_OUT: 139.25,85.25 140,85.25 140,86.75 139.25,86.75
  region net Current_OUT: 139.25,88.75 140,88.75 140,90.25 139.25,90.25
  region net PGND: 139.25,69.75 140,69.75 140,71.25 139.25,71.25
  region net PGND: 139.25,73.25 140,73.25 140,74.75 139.25,74.75
  region net PGND: 139.25,76.75 140,76.75 140,78.25 139.25,78.25
  region net NetD1_3: 42.758,25.751 42.758,25.001 44.258,25.001 44.258,25.751
  region net NetD1_3: 46.258,25.751 46.258,25.001 47.758,25.001 47.758,25.751
  region net NetD1_3: 49.758,25.751 49.758,25.001 51.258,25.001 51.258,25.751
  region net NetF1_1: 37.75,25.75 37.75,25 39.25,25 39.25,25.75
  region net NetF1_1: 34.25,25.75 34.25,25 35.75,25 35.75,25.75
  region net NetF1_1: 30.75,25.75 30.75,25 32.25,25 32.25,25.75

## Silkscreen, mask and mechanical layers (free items; w line width, h text height)
Top Overlay:
  drawing of 499 lines, arcs and shapes, not listed
  text "Reset" at 47.518,108.536 h0.6
  text "150Watt" at 37.5,102.6 h1.5
  text "RX/TX/EN" at 52.118,101.236 h0.5
  text "Mergen SMPS Board v0.0.1" at 26,101 h0.8
  text "Power" at 45.5,92.8 h0.6
  text "Set" at 68.1,81 h1
  text "-" at 60.9,80.6 h2
  text "+" at 53.4,80.5 h2
Bottom Overlay:
  drawing of 4183 lines, arcs and shapes, not listed
  text "Anode" at 139.1,98.599 h1.5 r90
  text "Cathode" at 139.3,68.373 h1.5 r90
  text "150Watt" at 114,54 h3
  text "Mergen SMPS Board v0.0.1" at 135.4,50.954 h1.61
  text "Project Number: 20240101" at 135.1,50.067 h0.8
  text "Operating Supply Voltage: 36VAC" at 135.1,48.667 h0.8
  text "System Output Voltage Range: 0-30VDC" at 135.1,47.267 h0.8
  text "Maximum Output Current: 5A" at 135.1,45.867 h0.8
  text "AC INPUT" at 54.6,33.949 h1 r90
  text "Attention: This project is open source and still under development. The project is always dangerous because it involves grid electricity's transformation and control. The engineer is not responsible for any adverse situation that may occur. / Contact: ig:mergenelk" at 132.3,30.3 h0.6
Top Paste:
  rectangle: 41.5,27 52.5,59.5
  region: 26.049,26.88 40.549,26.88 40.549,43.88 26.049,43.88

## Text inside footprints (layer, text, board x,y; h text height)
C15: Top Overlay "+" at 108.6,99.6 h1 r90
C19: Top Overlay "+" at 108.6,86.4 h1 r90
C20: Top Overlay "+" at 108.6,73.1 h1 r90
D1: Top Overlay "~" at 42.5,57.2 h1; Top Overlay "~" at 37.5,57.2 h1; Top Overlay "-" at 39,63.8 h1 r180; Top Overlay "+" at 44,63.8 h1 r180
U4: Top Overlay "16*2 LCD" at 62.6,62.5 h2